# Altium PCB TrackerPCB-v1.0.PcbDoc
Units mm, origin at the board's own origin, x right, y up, seen from the top; angles counter-clockwise.
Board outline 28 x 28 mm, 2 copper layers (Top Layer, Bottom Layer), stack 0.104 mm thick; 65 components, 50 nets, 254 pads, 0 vias.
Unrouted connection lines stored in the file: 182.
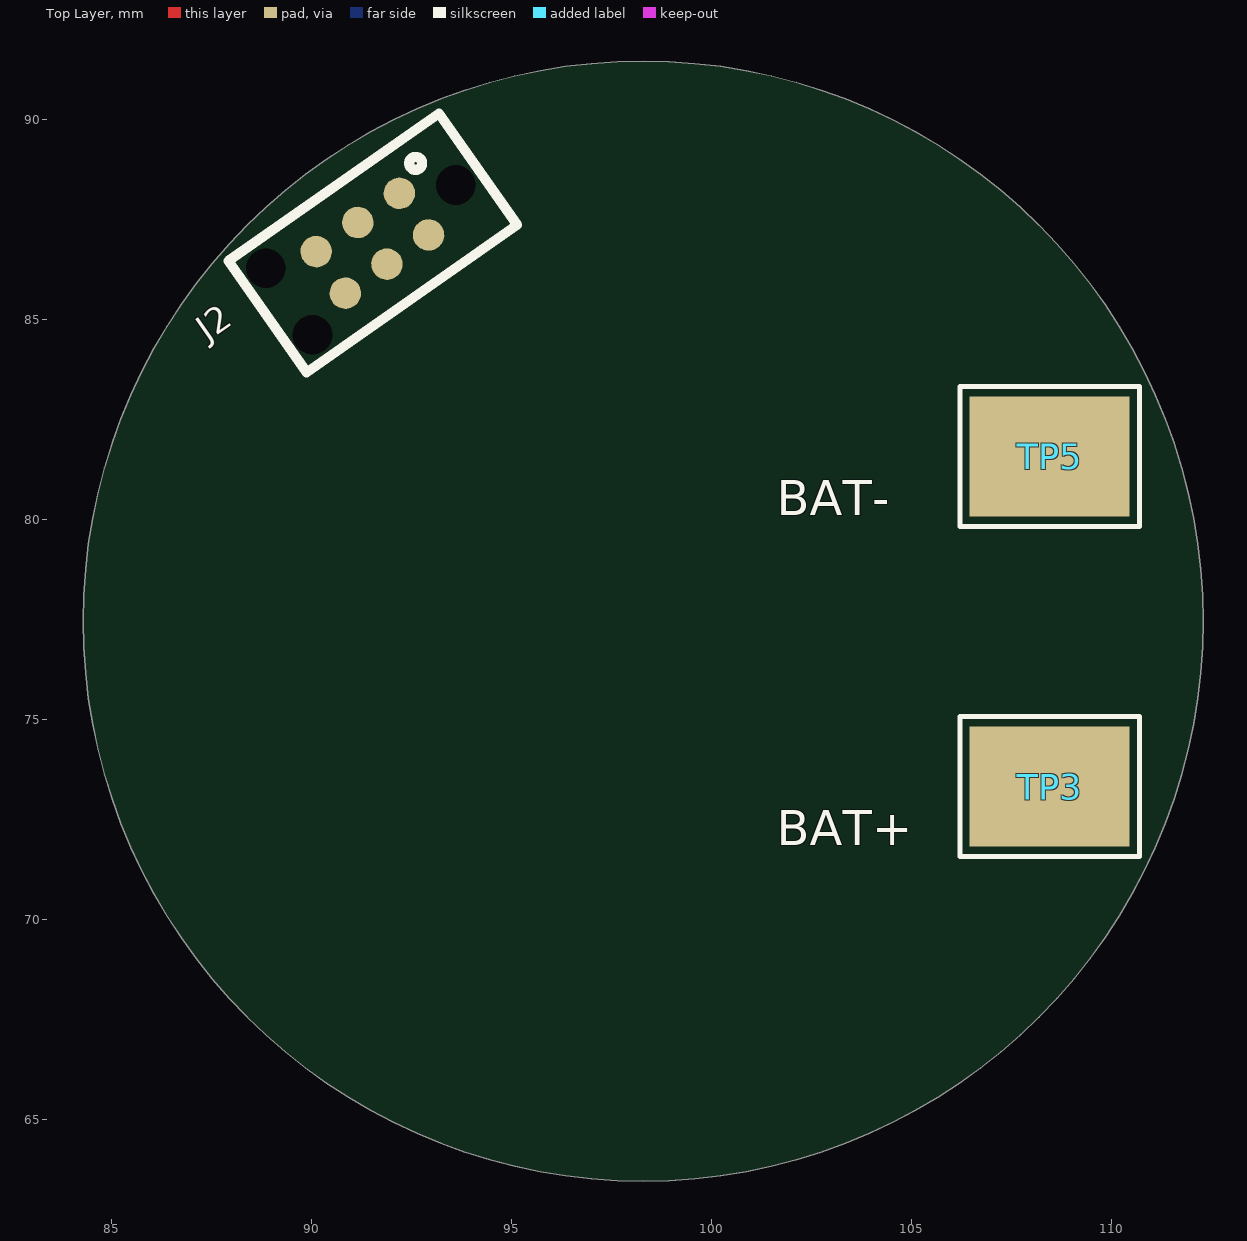
[diagram p0: Top Layer view]
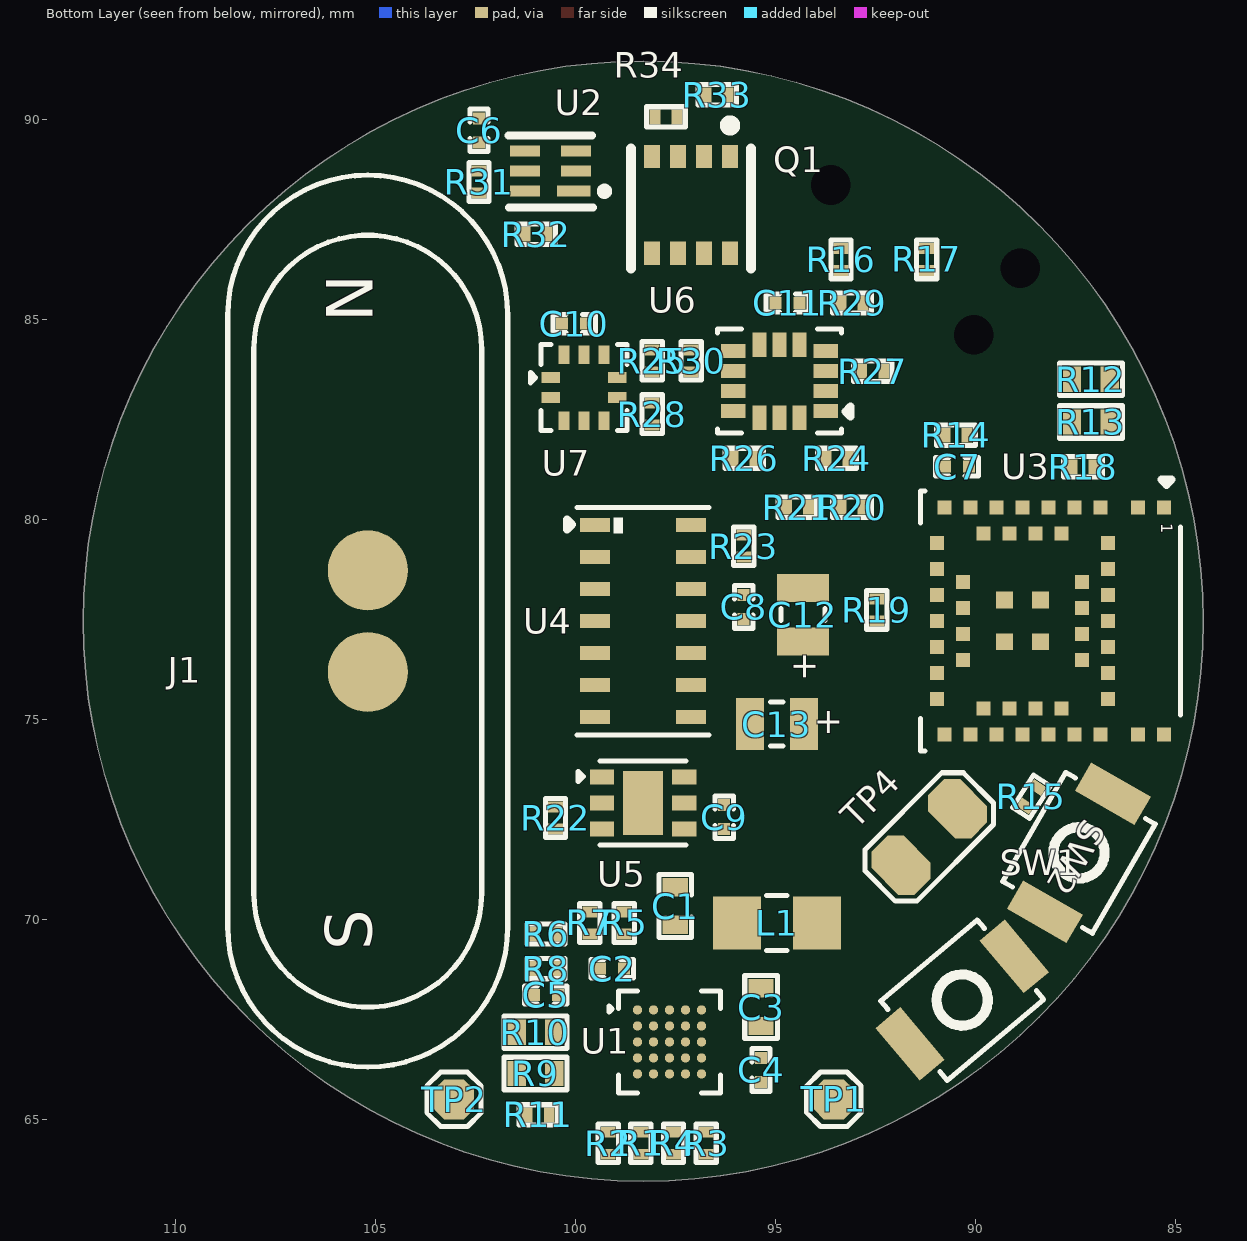
[diagram p1: Bottom Layer view, seen from below]

## Layer stack, top to bottom
Flex Top Coverlay: solder mask 0.008, FC-001, Dk 4
Polymide01, Dk 2.9: prepreg 0.0125, Core-009, Dk 2.9
Adhesive01: prepreg 0.015, PP-006, Dk 4.1
Top Layer: signal copper 0.012
Polymide02, Dk 3.3: prepreg 0.025, FR-4, Dk 3.3
Bottom Layer: signal copper 0.012
Adhesive02: prepreg 0.015, PP-006, Dk 4.1
Polymide, Dk 2.9: prepreg 0.0125, Core-009, Dk 2.9
Flex Bottom Coverlay: solder mask 0.008, FC-001, Dk 4

## Board outline
84.298,77.47 ccw(c98.298,77.47) 98.298,63.47 ccw(c98.298,77.47) 112.298,77.47 ccw(c98.298,77.47) 98.298,91.47 ccw(c98.298,77.47)

## Design rules (kind name [scope] priority, off if disabled: settings)
Clearance [All] p1: gap=0.254 ignorepadtopadclearanceinfootprint=TRUE except(0: Arc-Hole Track-Hole SMDPad-Hole THPad-Hole Via-Hole Fill-Hole Poly-Hole Region-Hole Text-Hole)
ComponentClearance [All] p1: gap=0 collisioncheckmode=3 verticalgap=0 showdistances=FALSE
Height [All] p1: minheight=0 maxheight=2.1 prefheight=1.5
PolygonConnect [All] p1: connectstyle=Relief reliefconductorwidth=0.254 reliefentries=4 polygonreliefangle="90 Angle" airgapwidth=0.254
RoutingVias [All] p1: holewidth=0.711 width=1.27 viastyle="Through Hole" minholewidth=0.711 minwidth=1.27 maxholewidth=0.711 maxwidth=1.27
SolderMaskExpansion [All] p1: expansion=0.102 istentingtop=FALSE
Width [All] p1: maxlimit=0.254 minlimit=0.254 preferedwidth=0.254
28 further rules are at their usual default settings.

## Classes and differential pairs
component class Sensors-Sheet: C8 C9 C10 C11 C12 C13 R22 R23 R24 R25 R26 R27 R28 R29 R30 U4 U5 U6 U7
component class Power-Sheet: C1 C2 C3 C4 C5 C6 J1 L1 Q1 R1 R2 R3 R4 R5 R6 R7 R8 R9 R10 R11 R31 R32 R33 R34 SW1 TP1 TP2 TP3 TP5 U1 U2
component class Controller-Sheet: C7 J2 R12 R13 R14 R15 R16 R17 R18 R19 R20 R21 SW2 TP4 U3

## Components (designator, comment, footprint, x,y, rotation, side; value= is the part's Value field where it differs from the comment)
C1 "4.7uF" Cap-0402 97.492,70.347 r270 bottom
C2 "1uF" CAP-0201 99.072,68.783 r180 bottom
C3 "10uF" Cap-0402 95.35,67.819 r270 bottom
C4 "1uF" CAP-0201 95.35,66.249 r90 bottom
C5 "1uF" CAP-0201 100.732,68.124 r180 bottom
C6 "100nF" CAP-0201 102.4,89.74 r90 bottom
C7 "100nF" CAP-0201 90.45,81.331 r0 bottom
C8 "100nF" CAP-0201 95.783,77.826 r90 bottom
C9 "100nF" CAP-0201 96.272,72.568 r270 bottom
C10 "100nF" CAP-0201 100.022,84.907 r180 bottom
C11 "100nF" CAP-0201 94.688,85.424 r0 bottom
C12 "22uF" Tant-0603 94.301,77.63 r90 bottom
C13 "22uF" Tant-0603 94.951,74.895 r0 bottom
J1 "A2P SMT-F" "A2P SMT-F" 105.181,77.47 r90 bottom
J2 "TC2030-IDC-NL" TC2030-IDC-NL_ 91.529,86.916 r215 top
L1 "2.2uH" IND-0805 94.956,69.922 r180 bottom
Q1 "AON3818" DFN-8(3x3) 97.097,87.874 r270 bottom
R1 "4.7K" Res-0201 98.354,64.418 r90 bottom
R2 "4.7K" Res-0201 99.169,64.418 r90 bottom
R3 "4.7K" Res-0201 96.724,64.418 r90 bottom
R4 "4.7K" Res-0201 97.539,64.418 r90 bottom
R5 "0R" Res-0201 98.772,69.923 r270 bottom
R6 "14K" Res-0201 100.732,69.648 r180 bottom
R7 "0R" Res-0201 99.63,69.923 r270 bottom
R8 "14.3K" Res-0201 100.732,68.783 r0 bottom
R9 "4.99K" Res-0402 100.99,66.161 r180 bottom value=4.99kR
R10 "4.99K" Res-0402 100.99,67.196 r180 bottom value=4.99kR
R11 "1K" Res-0201 100.921,65.126 r180 bottom
R12 "232k" Res-0402 87.105,83.515 r180 bottom
R13 "39.2K" Res-0402 87.105,82.448 r0 bottom
R14 "4.7K" Res-0201 90.475,82.118 r0 bottom
R15 "4.7K" Res-0201 88.59,73.08 r123 bottom
R16 "0R" Res-0201 93.35,86.512 r90 bottom
R17 "0R" Res-0201 91.211,86.512 r90 bottom
R18 "0R" Res-0201 87.3,81.331 r0 bottom
R19 "0R" Res-0201 92.456,77.75 r270 bottom
R20 "1K" Res-0201 93.075,80.315 r180 bottom
R21 "1K" Res-0201 94.441,80.315 r0 bottom
R22 "4.7K" Res-0201 100.488,72.548 r90 bottom
R23 "4.7K" Res-0201 95.783,79.345 r90 bottom
R24 "0R" Res-0201 93.453,81.538 r180 bottom
R25 "4.7K" Res-0201 98.072,83.976 r90 bottom
R26 "0R" Res-0201 95.773,81.538 r180 bottom
R27 "0R" Res-0201 92.556,83.718 r180 bottom
R28 "0R" Res-0201 98.072,82.646 r270 bottom
R29 "4.7K" Res-0201 93.075,85.424 r0 bottom
R30 "4.7K" Res-0201 97.098,83.976 r90 bottom
R31 "330R" Res-0201 102.4,88.449 r270 bottom
R32 "2.2K" Res-0201 100.973,87.145 r0 bottom
R33 "5.1M" Res-0201 96.444,90.627 r0 bottom
R34 "5.1M" Res-0201 97.727,90.075 r180 bottom
SW1 "B3U-1000P" B3U-1000P 90.322,67.996 r320 bottom
SW2 "B3U-1000P" B3U-1000P 87.401,71.679 r300 bottom
TP1 "TEST POINT 0.5mm Dia" "Test-point - 0.5mm" 93.53,65.516 r90 bottom
TP2 "TEST POINT 0.5mm Dia" "Test-point - 0.5mm" 103.025,65.516 r90 bottom
TP3 "3x4mm Test Pad SMD" "3x4mm Test Pad SMD" 108.458,73.335 r90 top
TP4 "2 Test Pad" "2 Test Pad" 91.85,71.368 r135 bottom
TP5 "3x4mm Test Pad SMD" "3x4mm Test Pad SMD" 108.458,81.585 r90 top
U1 "BQ25120AYFPR" 25-DSBGA 98.439,67.749 r180 bottom
U2 "BQ29702DSER" WSON-6(1.5x1.5) 100.612,88.724 r0 bottom
U3 "ANNA-B112-70B" ANNA-B112-70B 88.11,77.475 r270 bottom
U4 "MAX30102EFD+T" MAX30102EFD+T 98.298,77.47 r180 bottom
U5 "TMP117AIDRVR" WDFN-6-EP(2x2) 98.298,72.923 r180 bottom
U6 "LSM6DSOXTR" "14-LGA (2.5x3)" 94.888,83.468 r0 bottom
U7 "LPS22HHTR" HLGA-10(2x2) 99.774,83.306 r180 bottom

## Footprints (in the part's own frame and the unit in brackets; to place one, negate y for a bottom-side part, rotate by r counter-clockwise, add the part's x,y. Pads: shape width x height; smd on the part's side, far side on the other; paste and mask are expansions set on the pad)
"2 Test Pad" [mil]
  oct 45x60 smd: 1(0,0) 2(78.74,0)
  silkscreen extent -29,-36 108,36
"3x4mm Test Pad SMD" [mm]
  rect 3x4 smd: 1(0,0)
  silkscreen extent -1.75,-2.24 1.75,2.24
"14-LGA (2.5x3)" [mm]
  rect 0.61x0.35 smd mask+0.05: 1(-1.16,0.75) 2(-1.16,0.25) 3(-1.16,-0.25) 4(-1.16,-0.75) 8(1.16,-0.75) 9(1.16,-0.25) 10(1.16,0.25) 11(1.16,0.75)
  rect 0.35x0.61 smd mask+0.05: 5(-0.5,-0.91) 6(0,-0.91) 7(0.5,-0.91) 12(0.5,0.91) 13(0,0.91) 14(-0.5,0.91)
  silkscreen extent -1.78,-1.3 1.55,1.3, body extent -1.5,-1.25 1.5,1.25, height 0.86
25-DSBGA [mm]
  round 0.23 smd paste-1 mask+0.05: A1(0,0) A2(0.4,0) A3(0.8,0) A4(1.2,0) A5(1.6,0) B1(0,-0.4) B2(0.4,-0.4) B3(0.8,-0.4) B4(1.2,-0.4) B5(1.6,-0.4) C1(0,-0.8) C2(0.4,-0.8) C3(0.8,-0.8) C4(1.2,-0.8) C5(1.6,-0.8) D1(0,-1.2) D2(0.4,-1.2) D3(0.8,-1.2) D4(1.2,-1.2) D5(1.6,-1.2) E1(0,-1.6) E2(0.4,-1.6) E3(0.8,-1.6) E4(1.2,-1.6) E5(1.6,-1.6)
  silkscreen extent -0.71,-2.08 2.08,0.48, body extent -0.43,-2.06 2.03,0.46, height 0.5
"A2P SMT-F" [mm]
  round 2 smd: 1(-1.27,0) 2(1.27,0)
  silkscreen extent -11.15,-3.5 11.15,3.5, body extent -11.12,-3.47 11.18,3.53, height 2.1
ANNA-B112-70B [mm]
  rect 0.35x0.35 smd: 1(-2.84,2.84) 2(-2.84,2.19) 3(-2.84,1.248) 4(-2.84,0.598) 5(-2.84,-0.052) 6(-2.84,-0.702) 7(-2.84,-1.352) 8(-2.84,-2.002) 9(-2.84,-2.652) 10(-2.19,0.273) 11(-2.19,-0.377) 12(-2.19,-1.027) 13(-2.19,-1.677) 14(-1.95,-2.84) 15(-1.3,-2.84) 16(-0.65,-2.84) 17(0,-2.84) 18(0.65,-2.84) 19(1.3,-2.84) 20(1.95,-2.84) 21(-0.975,-2.19) 22(-0.325,-2.19) 23(0.325,-2.19) 24(0.975,-2.19) 25(2.84,-2.652) 26(2.84,-2.002) 27(2.84,-1.352) 28(2.84,-0.702) 29(2.84,-0.052) 30(2.84,0.598) 31(2.84,1.248) 32(2.84,2.19) 33(2.84,2.84) 34(2.19,-1.677) 35(2.19,-1.027) 36(2.19,-0.377) 37(2.19,0.273) 38(1.95,1.435) 39(1.3,1.435) 40(0.65,1.435) 41(0,1.435) 42(-0.65,1.435) 43(-1.3,1.435) 44(-1.95,1.435) 45(0.975,0.785) 46(0.325,0.785) 47(-0.325,0.785) 48(-0.975,0.785)
  rect 0.42x0.42 smd: 49(-0.52,-0.252) 50(-0.52,-1.152) 51(0.52,-1.152) 52(0.52,-0.252)
  silkscreen extent -3.53,-3.25 3.25,3.25, body extent -3.25,-3.25 3.25,3.25, height 1.25
B3U-1000P [mm] "SWITCH TACTILE SPST-NO 0.05A 12V"
  rect 0.82x1.72 smd: 1(-1.7,0) 2(1.7,0)
  silkscreen extent -1.57,-1.3 1.57,1.3, body extent -2,-1.26 2,1.24, height 1.6
CAP-0201 [mm]
  rect 0.3x0.3 smd mask+0.055: 1(-0.3,0) 2(0.3,0)
  silkscreen extent -0.53,-0.23 0.53,0.23, body extent -0.3,-0.15 0.3,0.15, height 0.28
Cap-0402 [mil]
  rect 18x25 smd mask+2.36: 1(-18.5,0) 2(18.5,0)
  silkscreen extent -31,-16 31,16, body extent -20,-10 20,10, height 19
DFN-8(3x3) [mm]
  rect 0.58x0.4 smd: 1(-1.21,0.975) 2(-1.21,0.325) 3(-1.21,-0.325) 4(-1.21,-0.975) 5(1.21,-0.975) 6(1.21,-0.325) 7(1.21,0.325) 8(1.21,0.975)
  silkscreen extent -2.11,-1.5 1.59,1.5
HLGA-10(2x2) [mm]
  rect 0.465x0.28 smd paste+0 mask+0.051: 1(-0.833,0.255) 2(-0.833,-0.245) 6(0.833,-0.245) 7(0.833,0.255)
  rect 0.28x0.465 smd paste+0 mask+0.051: 3(-0.5,-0.828) 4(0,-0.828) 5(0.5,-0.828) 8(0.5,0.828) 9(0,0.828) 10(-0.5,0.828)
  silkscreen extent -1.34,-1.07 1.08,1.08, body extent -1,-1 1,1, height 0.8
IND-0805 [mm] "Inductor 0805"
  rect 1.2x1.32 smd: 1(-1,0) 2(1,0)
  silkscreen extent -0.25,-0.69 0.25,0.69, body extent -1,-0.62 1,0.63, height 0.47
MAX30102EFD+T [mm]
  rect 0.75x0.35 smd: 1(-1.2,2.4) 2(-1.2,1.6) 3(-1.2,0.8) 4(-1.2,0) 5(-1.2,-0.8) 6(-1.2,-1.6) 7(-1.2,-2.4) 8(1.2,-2.4) 9(1.2,-1.6) 10(1.2,-0.8) 11(1.2,0) 12(1.2,0.8) 13(1.2,1.6) 14(1.2,2.4)
  silkscreen extent -1.9,-2.84 1.65,2.84, body extent -1.65,-2.8 1.65,2.8, height 1.65
Res-0201 [mm]
  rect 0.27x0.37 smd mask+0.055: 1(-0.275,0) 2(0.275,0)
  silkscreen extent -0.48,-0.25 0.48,0.25, body extent -0.3,-0.15 0.3,0.15, height 0.29
Res-0402 [mil]
  rect 18x25 smd mask+2.17: 1(-18.5,0) 2(18.5,0)
  silkscreen extent -32,-17 32,16, body extent -23,-11 23,11, height 16
Tant-0603 [mm]
  rect 0.7x1.3 smd: 1(-0.67,0) 2(0.67,0)
  silkscreen extent -0.15,-0.55 0.15,0.55, body extent -0.88,-0.52 0.88,0.52, height 0.89
TC2030-IDC-NL_ [mil]
  round 30.98 smd: 1(-50,-25) 1(-50,-25) 2(-50,25) 3(0,-25) 4(0,25) 5(50,-25) 6(50,25)
  round 0 hole 39.02: MP1(-100,0) MP2(100,40) MP3(100,-40)
  silkscreen extent -127,-67 126,67
"Test-point - 0.5mm" [mm]
  oct 1x1 smd: 1(0,0)
  silkscreen extent -0.68,-0.68 0.68,0.68
WDFN-6-EP(2x2) [mm]
  rect 0.607x0.364 smd: 1(-1.028,0.65) 2(-1.028,0) 3(-1.028,-0.65) 4(1.028,-0.65) 5(1.028,0) 6(1.028,0.65)
  rect 1x1.6 smd: 7(0,0)
  silkscreen extent -1.62,-1.05 1.08,1.05, body extent -1.01,-1 1.01,1, height 0.81
WSON-6(1.5x1.5) [mm]
  rect 0.84x0.28 smd: 1(-0.581,0.5)
  rect 0.75x0.28 smd: 2(-0.636,0) 3(-0.636,-0.5) 4(0.636,-0.5) 5(0.636,0) 6(0.636,0.5)
  silkscreen extent -1.41,-0.89 1.06,0.91, body extent -0.75,-0.75 0.75,0.75, height 0.8

## Part data
C1: library part CC0402KRX5R6BB475, "CAP CER 4.7UF 10V X5R 0402", Case Code (Imperial)=0402, Case Code (Metric)=1005, LCSC Part Number=C326586, Manufacturer=Yageo, Max Operating Temperature=85°C, Min Operating Temperature=-55°C, Supplier Part Number 1=3871698, Tolerance=10%, Voltage Rating=10V, Capacitance=4.7uF, Case/Package=0402, Category="Ceramic Capacitors", ComponentLink1Description=http://www.yageo.com/documents/recent/UPY-GPHC_X5R_4V-to-50V_25.pdf?src-supplier=Digi-Key, ComponentLink1URL=http://www.yageo.com/documents/recent/UPY-GPHC_X5R_4V-to-50V_25.pdf?src-supplier=Digi-Key, Manufacturer Part Number=CC0402KRX5R6BB475, Mount="Surface Mount", Packaging="Cut Tape", Pricing 1="10000=0.02310, 50000=0.02100 (GBP)", RoHS=Yes, RoHS Compliant=Yes, Stock 1=20000, Supplier 1=Farnell
C2 C4 C5: library part CC0201MRX5R6BB105, "CAP CER 1UF 10V X5R 0201", LCSC Part Number=C605210, Manufacturer=Yageo, Supplier Part Number=311-3474-1-ND, Category="Ceramic Capacitors", ComponentLink1Description=https://datasheet.octopart.com/CC0201MRX5R6BB105-Yageo-datasheet-158238148.pdf?src-supplier=Farnell, ComponentLink1URL=https://datasheet.octopart.com/CC0201MRX5R6BB105-Yageo-datasheet-158238148.pdf?src-supplier=Farnell, ComponentLink2Description=http://www.yageo.com/documents/recent/UPY-GPHC_X5R_4V-to-50V_25.pdf?src-supplier=Digi-Key, ComponentLink2URL=http://www.yageo.com/documents/recent/UPY-GPHC_X5R_4V-to-50V_25.pdf?src-supplier=Digi-Key, ComponentLink3Description=https://datasheet.octopart.com/CC0201MRX5R6BB105-Yageo-datasheet-137700082.pdf?src-supplier=Future+Electronics, ComponentLink3URL=https://datasheet.octopart.com/CC0201MRX5R6BB105-Yageo-datasheet-137700082.pdf?src-supplier=Future+Electronics, Item Type=Capacitor, Manufacturer Part Number=CC0201MRX5R6BB105, Pricing="1=0.19, 10=0.135, 50=0.0764, 100=0.0633, 500=0.04436, 1000=0.03672, 2500=0.03418, 5000=0.03127 (USD)", RoHS=Yes, Stock=772400, Supplier=Digi-Key
C3: library part CC0402MRX5R6BB106, "CAP CER 10UF 10V X5R 0402", Case Code (Imperial)=0402, Case Code (Metric)=1005, LCSC Part Number=C962143, Manufacturer=Yageo, Max Operating Temperature=85°C, Min Operating Temperature=-55°C, Supplier Part Number 1=6097631, Tolerance=20%, Voltage Rating=10V, Capacitance=10uF, Case/Package=0402, Category="Ceramic Capacitors", ComponentLink1Description=http://www.yageo.com/documents/recent/UPY-GPHC_X5R_4V-to-50V_25.pdf?src-supplier=Digi-Key, ComponentLink1URL=http://www.yageo.com/documents/recent/UPY-GPHC_X5R_4V-to-50V_25.pdf?src-supplier=Digi-Key, Item Type=Capacitor, Manufacturer Part Number=CC0402MRX5R6BB106, Mount="Surface Mount", Packaging="Tape and Reel", Pricing 1="10000=0.02650, 20000=0.02590, 30000=0.02550, 40000=0.02530, 50000=0.02450 (USD)", RoHS=Yes, RoHS Compliant=Yes, Stock 1=80000, Supplier 1="Future Electronics"
C6 C7 C8 C9 C10 C11: library part CC0201KRX5R6BB104, "CAP CER 0.1UF 10V X5R 0201", Case Code (Imperial)=0201, Case Code (Metric)=0603, Dielectric=X5R, LCSC Part Number=C190183, Manufacturer=Yageo, Max Operating Temperature=85°C, Min Operating Temperature=-55°C, Resistor Type=Ceramic, Supplier Part Number 1=603-CC201KRX5R6BB104, Tolerance=10%, Voltage Rating=10V, Capacitance=100nF, Case/Package=0201, Category="Ceramic Capacitors", ComponentLink1Description=https://datasheet.ciiva.com/11587/upy-gphc-x5r-4v-to-50v-12-11587190.pdf?src-supplier=Avnet, ComponentLink1URL=https://datasheet.ciiva.com/11587/upy-gphc-x5r-4v-to-50v-12-11587190.pdf?src-supplier=Avnet, Construction=Flat, Depth=0.3mm, Halogen Free="Halogen Free", Height=0.3mm, Lead Free="Lead Free", Length=0.6mm, Manufacturer Part Number=CC0201KRX5R6BB104, Mount="Surface Mount", Packaging="Tape and Reel", Pricing 1="1=0.10000, 10=0.02400, 50=0.02400, 100=0.01900, 1000=0.01100, 10000=0.00900 (USD)", Radiation Hardening=No, RoHS=Yes, RoHS Compliant=Yes, Series=CC, Stock 1=824403, Supplier 1=Mouser, Termination=SMD/SMT, Thickness=0.013inch, Voltage Rating (DC)=10V, Weight=6E-06oz, Width=0.012inch
C12 C13: library part T58MM226M6R3C0500, "CAP TANT POLY 22UF 6.3V 0603", LCSC Part Number=C2158410, Manufacturer=Vishay, Package=0603, Supplier Part Number=74-T58MM226M6R3C0500, Category="Tantalum Capacitors", ComponentLink1Description=http://www.farnell.com/datasheets/2617265.pdf?src-supplier=Farnell, ComponentLink1URL=http://www.farnell.com/datasheets/2617265.pdf?src-supplier=Farnell, ComponentLink2Description=https://datasheet.octopart.com/T58MM226M6R3C0500-Vishay-datasheet-78835337.pdf?src-supplier=Element14, ComponentLink2URL=https://datasheet.octopart.com/T58MM226M6R3C0500-Vishay-datasheet-78835337.pdf?src-supplier=Element14, ComponentLink3Description=https://datasheet.octopart.com/T58MM226M6R3C0500.-Vishay-datasheet-159617154.pdf?src-supplier=Newark, ComponentLink3URL=https://datasheet.octopart.com/T58MM226M6R3C0500.-Vishay-datasheet-159617154.pdf?src-supplier=Newark, ComponentLink4Description=http://www.farnell.com/datasheets/2617265.pdf?src-supplier=Newark, ComponentLink4URL=http://www.farnell.com/datasheets/2617265.pdf?src-supplier=Newark, ComponentLink5Description=http://www.vishay.com/docs/40189/t58.pdf?src-supplier=Avnet, ComponentLink5URL=http://www.vishay.com/docs/40189/t58.pdf?src-supplier=Avnet, ComponentLink6Description=https://datasheet.octopart.com/T58MM226M6R3C0500-Vishay-datasheet-95510002.pdf?src-supplier=Future+Electronics, ComponentLink6URL=https://datasheet.octopart.com/T58MM226M6R3C0500-Vishay-datasheet-95510002.pdf?src-supplier=Future+Electronics, ComponentLink7Description=https://www.vishay.com/docs/40189/t58.pdf?src-supplier=Digi-Key, ComponentLink7URL=https://www.vishay.com/docs/40189/t58.pdf?src-supplier=Digi-Key, ComponentLink8Description=LCSC, ComponentLink8URL=https://www.lcsc.com/product-detail/Tantalum-Capacitors_Vishay-Intertech-T58MM226M6R3C0500_C2158410.html, Item Type=Capacitor, Manufacturer Part Number=T58MM226M6R3C0500, Pricing="1=0.71, 10=0.379, 50=0.379, 100=0.313, 1000=0.208, 10000=0.168 (USD)", RoHS=Yes, Stock=4661, Supplier=Mouser
J1: "Magnetic Pogo Pin Connector 2 Positions Pitch 2.5/2.6 MM Spring Loaded Female Strip", Manufacturer Part Number="Pogo Pin Connector 2 Pin Female (2mm Height)", ComponentLink1Description=Aliexpress, ComponentLink1URL=https://vi.aliexpress.com/item/1005003511237426.html#nav-description
L1: library part LQM21PN2R2MGHL, "FIXED IND 2.2UH 1.3A 156MOHM SMD", Case Code (Imperial)=0805, Case Code (Metric)=2012, Current Rating=1.3A, DC Resistance (DCR)=156mR, LCSC Part Number=C341781, Manufacturer=Murata, Max Operating Temperature=85°C, Min Operating Temperature=-40°C, RMS Current (Irms)=1.7A, Saturation Current=450mA, Self Resonant Frequency=40MHz, Test Frequency=1MHz, Tolerance=20%, Case/Package=0805, ComponentLink1Description=http://search.murata.co.jp/Ceramy/image/img/P02/JELF243B-0040.pdf?src-supplier=Digikey, ComponentLink1URL=http://search.murata.co.jp/Ceramy/image/img/P02/JELF243B-0040.pdf?src-supplier=Digikey, ComponentLink2Description=http://www.murata.com/~/media/webrenewal/support/library/catalog/products/inductor/chip/o05e.ashx?src-supplier=Digikey, ComponentLink2URL=http://www.murata.com/~/media/webrenewal/support/library/catalog/products/inductor/chip/o05e.ashx?src-supplier=Digikey, Core Material=Ferrite, ESR=156mR, Height - Seated (Max)=0.039inch, Item Type="Fixed Inductors", Length=0.079inch, Manufacturer Part Number=LQM21PN2R2MGHL, Mounting Technology="Surface Mount", Packaging="Cut Tape", Pricing="1=0.3, 10=0.246, 50=0.246, 100=0.203, 1000=0.167, 10000=0.129 (USD)", RoHS=Yes, RoHS Compliant=Yes, Series=LQM21PN_GH, Shielding=Shielded, Stock=122655, Supplier=Mouser, Width=0.049inch
Q1: "24V 8A 21mΩ@2.5V 2.7W 1.2V@250uA 2 N-Channel DFN-8(3x3) MOSFETs ROHS", LCSC Part Number=C357850, Manufacturer=AOS, Package=DFN-8(3x3), Item Type=Mosfet, Manufacturer Part Number=AON3818
R1 R2 R3 R4 R14 R15 R22 R23 R25 R29 R30: library part RC0201FR-074K7L, "RES 4.7K OHM 1% 1/20W 0201", LCSC Part Number=C138135, Manufacturer=Yageo, Supplier Part Number=7537285, Category="Chip SMD Resistors", ComponentLink1Description=https://datasheet.ciiva.com/2493/pyu-r-int-thick-7-2493811.pdf?src-supplier=Digi-Key, ComponentLink1URL=https://datasheet.ciiva.com/2493/pyu-r-int-thick-7-2493811.pdf?src-supplier=Digi-Key, ComponentLink2Description=https://datasheet.ciiva.com/2493/pyu-r-int-thick-7-2493812.pdf?src-supplier=Digi-Key, ComponentLink2URL=https://datasheet.ciiva.com/2493/pyu-r-int-thick-7-2493812.pdf?src-supplier=Digi-Key, ComponentLink3Description=https://datasheet.ciiva.com/2493/pyu-r-int-thick-7-2493813.pdf?src-supplier=Digi-Key, ComponentLink3URL=https://datasheet.ciiva.com/2493/pyu-r-int-thick-7-2493813.pdf?src-supplier=Digi-Key, ComponentLink4Description=https://datasheet.ciiva.com/8892/pyu-rc0201-51-rohs-l-8-8892942.pdf?src-supplier=Avnet, ComponentLink4URL=https://datasheet.ciiva.com/8892/pyu-rc0201-51-rohs-l-8-8892942.pdf?src-supplier=Avnet, ComponentLink5Description=https://datasheet.ciiva.com/7672/1563626-7672233.pdf?src-supplier=Element14, ComponentLink5URL=https://datasheet.ciiva.com/7672/1563626-7672233.pdf?src-supplier=Element14, Item Type=Resistor, Manufacturer Part Number=RC0201FR-074K7L, Pricing="10000=0.0014, 50000=0.0013, 250000=0.0013, 750000=0.0012, 2000000=0.0011 (USD)", RoHS=Yes, Stock=1610000, Supplier="Future Electronics"
R5 R7 R16 R17 R18 R19 R24 R26 R27 R28: library part RC0201JR-070RL, "RES SMD 0 OHM JUMPER 1/20W 0201", Case Code (Imperial)=0201, Case Code (Metric)=0603, LCSC Part Number=C106228, Manufacturer=Yageo, Max Operating Temperature=125°C, Max Power Dissipation=50mW, Min Operating Temperature=-55°C, Package Quantity=10000, Resistance Tolerance=5%, Resistor Type="Thick Film", Supplier Part Number 1=311-0.0NCT-ND, Voltage Rating=25V, Case/Package=0201, Category="Chip SMD Resistors", ComponentLink1Description=https://datasheet.ciiva.com/7672/1563626-7672247.pdf?src-supplier=Element14, ComponentLink1URL=https://datasheet.ciiva.com/7672/1563626-7672247.pdf?src-supplier=Element14, ComponentLink2Description=https://datasheet.ciiva.com/7660/1421516-7660808.pdf?src-supplier=Element14, ComponentLink2URL=https://datasheet.ciiva.com/7660/1421516-7660808.pdf?src-supplier=Element14, ComponentLink3Description=https://datasheet.ciiva.com/7672/1563626-7672248.pdf?src-supplier=Element14, ComponentLink3URL=https://datasheet.ciiva.com/7672/1563626-7672248.pdf?src-supplier=Element14, ComponentLink4Description=https://datasheet.ciiva.com/16855/pyu-rc0201-51-rohs-l-8-16855994.pdf?src-supplier=Avnet+Europe, ComponentLink4URL=https://datasheet.ciiva.com/16855/pyu-rc0201-51-rohs-l-8-16855994.pdf?src-supplier=Avnet+Europe, ComponentLink5Description=https://datasheet.ciiva.com/28419/pyu-rc0201-51-rohs-l-8-28419660.pdf?src-supplier=Avnet+Europe, ComponentLink5URL=https://datasheet.ciiva.com/28419/pyu-rc0201-51-rohs-l-8-28419660.pdf?src-supplier=Avnet+Europe, ComponentLink6Description=https://datasheet.ciiva.com/46391/1421516-46391340.pdf?src-supplier=Element14, ComponentLink6URL=https://datasheet.ciiva.com/46391/1421516-46391340.pdf?src-supplier=Element14, ComponentLink7Description=https://datasheet.ciiva.com/8896/pyu-rc0201-51-rohs-l-8-8896143.pdf?src-supplier=Avnet, ComponentLink7URL=https://datasheet.ciiva.com/8896/pyu-rc0201-51-rohs-l-8-8896143.pdf?src-supplier=Avnet, Construction=Rectangular, Contact Plating=Tin,Matte, Depth=0.3mm, Features="Moisture Resistant", Height=0.01inch, Lead Free="Lead Free", Length=0.6mm, Manufacturer Part Number=RC0201JR-070RL, Military Standard=Not, Number of Terminations=2, Packaging="Tape and Reel", Power Rating=50mW, Pricing 1="1=0.10000, 10=0.03600, 25=0.02640, 50=0.02000, 100=0.01480, 250=0.01128, 500=0.00904, 1000=0.00665, 5000=0.00477 (USD)", Radiation Hardening=No, REACH SVHC=Unknown, Resistance=0R, RoHS=Yes, RoHS Compliant=Yes, Series=RC, Size Code=0201, Stock 1=11079, Supplier 1=Digi-Key, Termination=SMD/SMT, Tolerance=5%, Voltage Rating (DC)=25V, Weight=6E-06oz, Width=0.012inch
R6: library part 0201WMF1402TEE, "50mW Thick Film Resistor 25V ±1% ±200ppm/℃ 14kΩ 0201 Chip Resistor - Surface Mount ROHS", LCSC Part Number=C474280, Manufacturer=UNI-ROYAL, Package=0201, ComponentLink1Description=LCSC, ComponentLink1URL=https://www.lcsc.com/product-detail/C474280.html, Item Type=Resistor, Manufacturer Part Number=0201WMF1402TEE
R8: library part RC0201FR-0714K3L, "RES 14.3K OHM 1% 1/20W 0201", LCSC Part Number=C273298, Manufacturer=Yageo, Voltage Rating=25V, ComponentLink1Description=https://www.yageo.com/upload/media/product/productsearch/datasheet/rchip/PYu-RC_Group_51_RoHS_L_11.pdf?src-supplier=Digikey, ComponentLink1URL=https://www.yageo.com/upload/media/product/productsearch/datasheet/rchip/PYu-RC_Group_51_RoHS_L_11.pdf?src-supplier=Digikey, ComponentLink2Description=http://www.yageo.com/documents/recent/PYu-RC_Group_51_RoHS_L_10.pdf?src-supplier=Digikey, ComponentLink2URL=http://www.yageo.com/documents/recent/PYu-RC_Group_51_RoHS_L_10.pdf?src-supplier=Digikey, ComponentLink3Description=http://www.yageo.com/documents/recent/PYu-RC_Group_51_RoHS_L_9.pdf?src-supplier=Digikey, ComponentLink3URL=http://www.yageo.com/documents/recent/PYu-RC_Group_51_RoHS_L_9.pdf?src-supplier=Digikey, ComponentLink4Description=https://datasheet.octopart.com/RC0201FR-0714K3L-Yageo-datasheet-164759695.pdf?src-supplier=Future+Electronics, ComponentLink4URL=https://datasheet.octopart.com/RC0201FR-0714K3L-Yageo-datasheet-164759695.pdf?src-supplier=Future+Electronics, Item Type=Resistors, Lead Free=5697LeadFree, Manufacturer Part Number=RC0201FR-0714K3L, Pricing="1=0.104, 25=0.018, 100=0.009, 250=0.008, 500=0.007 (USD)", RoHS=Yes, Stock=7360, Supplier=Avnet
R9 R10: library part RC0402FR-074K99L, "RES 4.99K OHM 1% 1/16W 0402", Case Code (Imperial)=0402, Case Code (Metric)=1005, LCSC Part Number=C137965, Manufacturer=Yageo, Max Operating Temperature=155°C, Max Power Dissipation=63mW, Min Operating Temperature=-55°C, Package Quantity=1, Power Rating=62.5mW, Resistance Tolerance=1%, Resistor Type="Thick Film", Temperature Coefficient=100ppm/°C, Voltage Rating=50V, Case/Package=0402, ComponentLink1Description=https://datasheet.ciiva.com/7983/1018594-7983547.pdf?src-supplier=Element14, ComponentLink1URL=https://datasheet.ciiva.com/7983/1018594-7983547.pdf?src-supplier=Element14, ComponentLink2Description=https://datasheet.ciiva.com/2553/pyu-r-int-thick-7-2553228.pdf?src-supplier=Digikey, ComponentLink2URL=https://datasheet.ciiva.com/2553/pyu-r-int-thick-7-2553228.pdf?src-supplier=Digikey, ComponentLink3Description=https://datasheet.ciiva.com/2553/pyu-r-int-thick-7-2553229.pdf?src-supplier=Digikey, ComponentLink3URL=https://datasheet.ciiva.com/2553/pyu-r-int-thick-7-2553229.pdf?src-supplier=Digikey, ComponentLink4Description=https://datasheet.ciiva.com/2553/pyu-r-int-thick-7-2553227.pdf?src-supplier=Digikey, ComponentLink4URL=https://datasheet.ciiva.com/2553/pyu-r-int-thick-7-2553227.pdf?src-supplier=Digikey, ComponentLink5Description=https://datasheet.ciiva.com/17040/pyu-rc0402-51-rohs-l-6-r-17040490.pdf?src-supplier=Future+Electronics, ComponentLink5URL=https://datasheet.ciiva.com/17040/pyu-rc0402-51-rohs-l-6-r-17040490.pdf?src-supplier=Future+Electronics, ComponentLink6Description=https://datasheet.ciiva.com/15159/getdatasheetpartid-33192-15159419.pdf?src-supplier=Verical, ComponentLink6URL=https://datasheet.ciiva.com/15159/getdatasheetpartid-33192-15159419.pdf?src-supplier=Verical, Construction=Rectangular, Depth=0.5mm, Features="Moisture Resistant", Height=0.016inch, Item Type=Resistors, Lead Free=5697LeadFree, Length=1mm, Manufacturer Part Number=RC0402FR-074K99L, Military Standard=Not, Number of Terminations=2, Packaging="Tape and Reel", Pricing="1=0.1, 10=0.007, 50=0.007, 100=0.004, 1000=0.004, 10000=0.002 (USD)", Reach SVHC Compliant=No, RoHS=Yes, RoHS Compliant=Yes, Series=RC, Stock=181979, Supplier=Mouser, Termination=SMD/SMT, Tolerance=1%, Voltage Rating (DC)=50V, Width=0.02inch
R11 R20 R21: library part RC0201FR-071KP, "RES 1K OHM 1% 1/20W 0201", LCSC Part Number=C3953443, Manufacturer=Yageo, Supplier Part Number 1=13-RC0201FR-071KPCT-ND, Manufacturer Part Number=RC0201FR-071KP, Pricing 1="1=0.11000, 10=0.10200, 100=0.03940, 1000=0.01734, 2500=0.01497, 5000=0.01340 (USD)", RoHS=Yes, RoHS Compliant=Yes, Stock 1=4800, Supplier 1=Digi-Key
R12: library part RT0402BRD07232KL, "RES 232K OHM 0.1% 1/16W 0402", LCSC Part Number=C852652, Manufacturer=Yageo, Supplier Part Number=603-RT0402BRD07232KL, Category="Chip SMD Resistors", ComponentLink1Description=https://datasheet.octopart.com/RT0402BRD07232KL-Yageo-datasheet-166250672.pdf?src-supplier=Future+Electronics, ComponentLink1URL=https://datasheet.octopart.com/RT0402BRD07232KL-Yageo-datasheet-166250672.pdf?src-supplier=Future+Electronics, Item Type=Resistor, Manufacturer Part Number=RT0402BRD07232KL, Pricing="1=0.47, 10=0.338, 50=0.338, 100=0.135, 1000=0.067, 10000=0.048 (USD)", RoHS=Yes, Stock=9850, Supplier=Mouser
R13: library part RT0402BRD0739K2L, "RES SMD 39.2KOHM 0.1% 1/16W 0402", LCSC Part Number=C723512, Manufacturer=Yageo, ComponentLink1Description=https://datasheet.ciiva.com/12721/pyu-rt-1-to-0-05-rohs-l-4-12721702.pdf?src-supplier=Mouser, ComponentLink1URL=https://datasheet.ciiva.com/12721/pyu-rt-1-to-0-05-rohs-l-4-12721702.pdf?src-supplier=Mouser, Item Type=Resistors, Manufacturer Part Number=RT0402BRD0739K2L, Pricing="1=0.16, 10=0.124, 50=0.1, 100=0.0898, 500=0.06834, 1000=0.06018, 5000=0.04449 (USD)", RoHS=Yes, Stock=17375, Supplier=Digikey
R31: library part RC0201FR-07330RL, "50mW Thick Film Resistor 25V ±1% ±200ppm/℃ 330Ω 0201 Chip Resistor - Surface Mount ROHS", LCSC Part Number=C274872, Manufacturer=YAGEO, Package=0201, Item Type=Resistor, Manufacturer Part Number=RC0201FR-07330RL
R32: library part RC0201FR-072K2L, "RES 2.2K OHM 1% 1/20W 0201", Case Code (Imperial)=0201, Case Code (Metric)=0603, LCSC Part Number=C142018, Manufacturer=Yageo, Max Operating Temperature=125°C, Max Power Dissipation=50mW, Min Operating Temperature=-55°C, Resistance=2.2kR, Resistance Tolerance=1%, Resistor Type="Thick Film", Temperature Coefficient=200ppm/°C, Voltage Rating=25V, Case/Package=0201, Category="Chip SMD Resistors", ComponentLink1Description=https://datasheet.ciiva.com/7672/1563626-7672218.pdf?src-supplier=Element14, ComponentLink1URL=https://datasheet.ciiva.com/7672/1563626-7672218.pdf?src-supplier=Element14, Construction=Rectangular, Depth=0.3mm, Features="Moisture Resistant", Height=0.01inch, Item Type=Resistor, Lead Free="Lead Free", Length=0.024inch, Manufacturer Part Number=RC0201FR-072K2L, Military Standard=Not, Number of Terminations=2, Packaging="Tape and Reel", Power Rating=50mW, Pricing 1="10000=0.00510, 30000=0.00350, 50000=0.00330, 100000=0.00220 (USD)", RoHS=Yes, RoHS Compliant=Yes, Series=RC, Size Code=0201, Stock 1=90000, Supplier 1="Arrow Electronics", Supplier Part Number 1=RC0201FR-072K2L, Termination=SMD/SMT, Tolerance=1%, Width=0.3mm
R33 R34: library part RC0201FR-075M1L, "50mW Thick Film Resistor 25V ±1% ±200ppm/℃ 5.1MΩ 0201 Chip Resistor - Surface Mount ROHS", LCSC Part Number=C474428, Manufacturer=YAGEO, Package=0201, Item Type=Resistor, Manufacturer Part Number=RC0201FR-075M1L
SW1 SW2: "SWITCH TACTILE SPST-NO 0.05A 12V", Contact Current Rating=50mA, Contact Resistance=100mR, Insulation Resistance=100MR, LCSC Part Number=C231329, Manufacturer=Omron, Max Operating Temperature=70°C, Max Voltage Rating (DC)=12V, Min Operating Temperature=-25°C, Operating Force=1.5N, Package Quantity=1, Ratings="Dust Proof,IP40", Supplier Part Number 1=SW1020DKR-ND, Actuator Length=0.4mm, Actuator Type=Standard, ComponentLink1Description=http://www.farnell.com/datasheets/60838.pdf?src-supplier=Farnell, ComponentLink1URL=http://www.farnell.com/datasheets/60838.pdf?src-supplier=Farnell, ComponentLink2Description=http://www.farnell.com/datasheets/60838.pdf?src-supplier=Element14, ComponentLink2URL=http://www.farnell.com/datasheets/60838.pdf?src-supplier=Element14, ComponentLink3Description=https://omronfs.omron.com/en_US/ecb/products/pdf/en-b3u.pdf?src-supplier=Digi-Key, ComponentLink3URL=https://omronfs.omron.com/en_US/ecb/products/pdf/en-b3u.pdf?src-supplier=Digi-Key, ComponentLink4Description=http://www.omron.com/ecb/products/pdf/en-b3u.pdf?src-supplier=Digi-Key, ComponentLink4URL=http://www.omron.com/ecb/products/pdf/en-b3u.pdf?src-supplier=Digi-Key, ComponentLink5Description=https://www.distrelec.biz/Web/Downloads/he/et/B3U_eng_datasheet.pdf?mime=application%2Fpdf&src-supplier=Distrelec, ComponentLink5URL=https://www.distrelec.biz/Web/Downloads/he/et/B3U_eng_datasheet.pdf?mime=application%2Fpdf&src-supplier=Distrelec, ComponentLink6Description=http://www.onlinecomponents.com/productFiles/mf-OM/en-b3u.pdf?src-supplier=Onlinecomponents.com, ComponentLink6URL=http://www.onlinecomponents.com/productFiles/mf-OM/en-b3u.pdf?src-supplier=Onlinecomponents.com, ComponentLink7Description=https://www.verical.com/server-webapp/html/getDatasheet?partID=552554&src-supplier=Verical, ComponentLink7URL=https://www.verical.com/server-webapp/html/getDatasheet?partID=552554&src-supplier=Verical, ComponentLink8Description=http://www.farnell.com/datasheets/1685550.pdf?src-supplier=Element14, ComponentLink8URL=http://www.farnell.com/datasheets/1685550.pdf?src-supplier=Element14, ComponentLink9Description=http://www.farnell.com/datasheets/2610940.pdf?src-supplier=Farnell, ComponentLink9URL=http://www.farnell.com/datasheets/2610940.pdf?src-supplier=Farnell, ComponentLink10Description=https://www.alliedelec.com/m/d/4c8a9ef82804fc3c241a13c1e298fd73.pdf?src-supplier=Allied+Electronics, ComponentLink10URL=https://www.alliedelec.com/m/d/4c8a9ef82804fc3c241a13c1e298fd73.pdf?src-supplier=Allied+Electronics, Contact Material=Silver, Current Rating=50mA, Depth=2.5mm, Electrical Life=200000Cycles, Height=1.2mm, Illumination Type=Non-Illuminated,Illuminated, Item Type=Switch, Lead Free="Lead Free", Length=4mm, Manufacturer Part Number=B3U-1000P, Max Current Rating=50mA, Mechanical Life=200000Cycles, Mount="Surface Mount", Orientation=Straight, Packaging="Tape and Reel", Pricing 1="1=1, 10=0.961, 25=0.9064, 50=0.7976, 100=0.7251, 250=0.68888, 500=0.67074, 1000=0.52571 (USD)", REACH SVHC=Unknown, Stock 1=116454, Supplier 1=Digi-Key, Switch Function=Off-Mom, Switch Travel=0.15mm, Termination=SMD/SMT, Throw Configuration=SPST, Voltage Rating (DC)=12V, Weight=0.000776oz, Width=3mm
TP1 TP2: "Test Point ON", Item Type="Test Point", Manufacturer Part Number="TEST POINT 0.5mm Dia"
TP4: "Wire Connecting Pad", Item Type="Test Point", Manufacturer Part Number="2 Test Pad"
U1: "IC BATT CHG LI-ION 1CELL 25DSBGA", LCSC Part Number=C2866577, Manufacturer="Texas Instruments", Min Supply Voltage=3.4V, Nominal Supply Current=1mA, ComponentLink1Description=http://www.ti.com/lit/ds/symlink/bq25120a.pdf?src-supplier=Digikey, ComponentLink1URL=http://www.ti.com/lit/ds/symlink/bq25120a.pdf?src-supplier=Digikey, Height=500um, Item Type=IC, Manufacturer Part Number=BQ25120AYFPR, Number of Outputs=1NUMBER, Pins=25NUMBER, Pricing="1=3.71, 10=2.8, 50=2.58, 100=2.33, 1000=1.97, 10000=1.83 (USD)", RoHS=Yes, Stock=1796, Supplier=Mouser, Thickness=0m, Width=0m
U2: "1.5V~8V Lithium Battery 1 WSON-6(1.5x1.5) Battery Management ROHS", LCSC Part Number=C2872632, Manufacturer=TI, Package=WSON-6(1.5x1.5), Item Type=IC, Manufacturer Part Number=BQ29702DSER
U3: "RF TXRX MOD BLUETOOTH CHIP SMD", LCSC Part Number=C5451782, Manufacturer=u-blox, Item Type=Module, Manufacturer Part Number=ANNA-B112-70B, Pricing="1=7.09, 10=7.09, 50=7.09, 100=7.09, 1000=7.09, 10000=7.09 (USD)", RoHS=No, Stock=1511, Supplier=Mouser
U4: "SENSOR OXIMETER/HEART RATE I2C", LCSC Part Number=C6454833, Manufacturer=Maxim, Max Operating Temperature=85°C, Min Operating Temperature=-40°C, Supplier Part Number=700-MAX30102EFD+T, Category=Sensors, ComponentLink1Description=https://datasheets.maximintegrated.com/en/ds/MAX30102.pdf?src-supplier=Digi-Key, ComponentLink1URL=https://datasheets.maximintegrated.com/en/ds/MAX30102.pdf?src-supplier=Digi-Key, Item Type="Heart Rate Sensor", Manufacturer Part Number=MAX30102EFD+T, Output Type=I2C, Packaging="Cut Tape", Pricing="1=12.43, 10=9.84, 50=9.32, 100=7.95, 1000=7.05, 10000=6.66 (USD)", RoHS=Yes, RoHS Compliant=Yes, Series=-, Stock=7965, Supplier=Mouser
U5: "Temperature Sensor Digital, Local -55°C ~ 150°C 16 b 6-WSON (2x2)", LCSC Part Number=C699536, Manufacturer="Texas Instruments", Max Supply Voltage=5.5V, Min Supply Voltage=1.8V, ComponentLink1Description=http://www.ti.com/lit/gpn/tmp117?src-supplier=Digikey, ComponentLink1URL=http://www.ti.com/lit/gpn/tmp117?src-supplier=Digikey, ComponentLink2Description=http://www.ti.com/lit/ds/symlink/tmp117.pdf?src-supplier=Digikey, ComponentLink2URL=http://www.ti.com/lit/ds/symlink/tmp117.pdf?src-supplier=Digikey, Height=800um, Interface=39,4268,4478Interface, Item Type=IC, Length=2mm, Manufacturer Part Number=TMP117AIDRVR, Pins=6NUMBER, Pricing="1=4.53, 10=3.95, 50=3.64, 100=3.52, 1000=3.27, 10000=3.04 (USD)", RoHS=Yes, Stock=14370, Supplier=Mouser, Thickness=750um, Width=2mm
U6: "INEMO INERTIAL MODULE: 3D ACCELE", Case/Package=LGA, LCSC Part Number=C481766, Manufacturer=STMicroelectronics, Max Operating Temperature=85°C, Max Supply Voltage=3.6V, Min Operating Temperature=-40°C, Min Supply Voltage=1.62V, Operating Supply Current=550uA, Operating Supply Voltage=1.8V, ComponentLink1Description=http://www.farnell.com/datasheets/2736724.pdf?src-supplier=Farnell, ComponentLink1URL=http://www.farnell.com/datasheets/2736724.pdf?src-supplier=Farnell, ComponentLink2Description=https://www.st.com/resource/en/datasheet/lsm6dsox.pdf?src-supplier=Digikey, ComponentLink2URL=https://www.st.com/resource/en/datasheet/lsm6dsox.pdf?src-supplier=Digikey, ComponentLink3Description=http://www.farnell.com/datasheets/2736724.pdf?src-supplier=Element14, ComponentLink3URL=http://www.farnell.com/datasheets/2736724.pdf?src-supplier=Element14, ComponentLink4Description=http://www.farnell.com/datasheets/2736724.pdf?src-supplier=Newark, ComponentLink4URL=http://www.farnell.com/datasheets/2736724.pdf?src-supplier=Newark, Height=860um, Item Type=IC, Manufacturer Part Number=LSM6DSOXTR, Mounting Technology="Surface Mount", Output Type=SPI,I2C, Packaging="Cut Tape", Pricing="1=4.21, 10=3.61, 50=3.28, 100=3.16, 1000=2.84, 10000=2.64 (USD)", RoHS=Yes, Sensor Type="Accelerometer,Gyroscope,6 Axis", Series=iNEMO, Stock=1151, Supplier=Mouser
U7: "SENSOR 18.27PSIA 24BIT 10HLGA", Case/Package=HLGA, LCSC Part Number=C2827824, Manufacturer=STMicroelectronics, Max Operating Temperature=85°C, Max Supply Voltage=3.7V, Min Operating Temperature=-40°C, Min Supply Voltage=1.7V, Operating Pressure=18.27PSI, ComponentLink1Description=http://www.farnell.com/datasheets/2710908.pdf?src-supplier=Farnell, ComponentLink1URL=http://www.farnell.com/datasheets/2710908.pdf?src-supplier=Farnell, ComponentLink2Description=http://www.farnell.com/datasheets/2710908.pdf?src-supplier=Newark, ComponentLink2URL=http://www.farnell.com/datasheets/2710908.pdf?src-supplier=Newark, ComponentLink3Description=https://www.st.com/resource/en/datasheet/lps22hh.pdf?src-supplier=Digikey, ComponentLink3URL=https://www.st.com/resource/en/datasheet/lps22hh.pdf?src-supplier=Digikey, ComponentLink4Description=https://www.st.com/resource/en/data_brief/lps22hh.pdf?src-supplier=Digikey, ComponentLink4URL=https://www.st.com/resource/en/data_brief/lps22hh.pdf?src-supplier=Digikey, Height=800um, Item Type="Pressure Sensors", Manufacturer Part Number=LPS22HHTR, Max Pressure=290PSI, Output Type=SPI,I2C, Packaging="Cut Tape", Pins=10, Port Style="No Port", Pressure Type=Absolute, Pricing="1=2.49, 10=2, 50=1.91, 100=1.84, 1000=1.63, 10000=1.49 (USD)", RoHS=Yes, RoHS Compliant=Yes, Series=-, Stock=8715, Supplier=Mouser, Termination=SMD/SMT

## Nets (pads, with @x,y where several pads share a name; then routed paths per layer and width w, separated by ;. In a path a pad name is that pad's centre, name@x,y a point inside that pad or via, vN(x,y) a via of type N, cw(c..) or ccw(c..) an arc to the next point about the centre after c; other vN are vias at no path point)
1V8: C3.2 C7.2 C8.1 C9.1 C10.1 C11.1 L1.2 R1.1 R2.1 R3.1 R4.1 R14.2 R15.1 R16.1 R20.2 R21.2 R22.2 R23.2 R25.2 R26.1 R28.2 R29.2 R30.2 U1.B4 U1.B5 U1.C4 U3.9 U4.11 U5.5 U6.5 U6.8 U7.1 U7.10
ALRT_TMP: R22.1 U3.35 U5.3
CD: R1.2 U1.E2 U3.25
COUT: Q1.2 R33.2 U2.2
DOUT: Q1.4 R34.1 U2.3
GND: C1.1 C2.1 C3.1 C4.1 C5.1 C7.1 C8.2 C9.2 C10.2 C11.2 C12.2 C13.2 J2.5 Q1.1 R7.2 R8.1 R9.1 R10.1 R11.1 R13.1 R18.2 R19.1 R24.2 R27.2 R32.1 R33.1 SW1.1 SW2.2 U1.A1 U1.A5 U1.D5 U3.4 U3.7 U3.8 U3.10 U3.11 U3.32 U3.33 U3.41 U3.42 U3.43 U3.44 U3.46 U3.47 U3.48 U3.49 U3.50 U3.51 U3.52 U4.4 U4.12 U5.2 U5.4 U5.7 U6.6 U6.7 U7.3 U7.5 U7.8 U7.9
INT: R2.2 U1.D2 U3.26
INT1_LSM: R29.1 U3.31 U6.4
INT2_LSM: R30.1 U3.34 U6.9
INT_LPS: R25.1 U3.30 U7.7
MAX_INT: R23.1 U3.29 U4.13
NetC4_2: C4.2 U1.C5
NetC6_1: C6.1 R31.1 U2.5
NetC6_2: C6.2 Q1.3 R34.2 TP5.1 U2.4
NetJ1_1: J1.1 R7.1
NetJ1_2: J1.2 R5.1
NetJ2_1: J2.1 R16.2
NetJ2_3: J2.3 R17.2
NetL1_1: L1.1 U1.A4
NetQ1_5: Q1.5 Q1.6
NetQ1_7: Q1.7 Q1.8
NetR4_2: R4.2 U1.E3
NetR6_1: R6.1 R8.2 TP2.1 U1.C3
NetR9_2: R9.2 U1.D1
NetR10_2: R10.2 U1.C1
NetR11_2: R11.2 U1.C2
NetR12_1: R12.1 R13.2 U3.24
NetR15_2: R15.2 SW2.1 U3.28
NetR18_1: R18.1 U3.2 U3.3
NetR19_2: R19.2 U3.17 U3.18
NetR24_1: R24.1 U6.1
NetR26_2: R26.2 U6.12
NetR27_1: R27.1 U6.2 U6.3
NetR28_1: R28.1 U7.6
NetR32_2: R32.2 U2.6
NetSW1_2: SW1.2 U1.E1
NetTP1_1: TP1.1 U1.D4
NetU3_5: U3.5 U3.6
RESET_MCU: R14.1 R17.1 U3.12
RST: R3.2 U1.D3 U3.27
RX: TP4.2 U3.20
SCL: R21.1 U1.E5 U3.15 U4.2 U5.1 U6.13 U7.2
SDA: R20.1 U1.E4 U3.14 U4.3 U5.6 U6.14 U7.4
SWDCLK: J2.4 U3.39
SWDIO: J2.2 U3.40
SWO: J2.6 U3.16
TX: TP4.1 U3.19
VBAT: C5.2 R12.2 R31.2 TP3.1 U1.B1 U1.B2
VIN: C2.2 R5.2 R6.2 U1.A2
VLED+: C1.2 C12.1 C13.1 U1.A3 U1.B3 U4.9 U4.10
pads on no net: J2.MP1 J2.MP2 J2.MP3 U2.1 U3.1 U3.13 U3.21 U3.22 U3.23 U3.36 U3.37 U3.38 U3.45 U4.1 U4.5 U4.6 U4.7 U4.8 U4.14 U6.10 U6.11

## Silkscreen, mask and mechanical layers (free items; w line width, h text height)
Top Overlay:
  text "BAT-" at 101.634,79.832 h1.5
  text "BAT+" at 101.634,71.582 h1.5
Board Outline:
  circle w0.254: c98.298,77.47 r14
  lines w0.127: 84.298,77.47 112.298,77.47 ; 98.298,63.47 98.298,91.47

## Text inside footprints (layer, text, board x,y; h text height)
C12: Bottom Overlay "+" at 93.984,75.969 h0.64 r270
C13: Bottom Overlay "+" at 93.29,75.212 h0.64 r180
J1: Bottom Overlay "S" at 104.695,69.24 h2 r270; Bottom Overlay "N" at 104.673,84.938 h2 r270
U3: Bottom Overlay "1" at 85.443,79.914 h0.5 r90